# Altium PCB IT_FRONT_PANEL.PcbDoc (part 1 of 2)
Units mm, origin at the board's own origin, x right, y up, seen from the top; angles counter-clockwise.
Board outline 150 x 100 mm, 2 copper layers (Top Layer, Bottom Layer), stack 1.601 mm thick; 78 components, 80 nets, 343 pads, 132 vias.
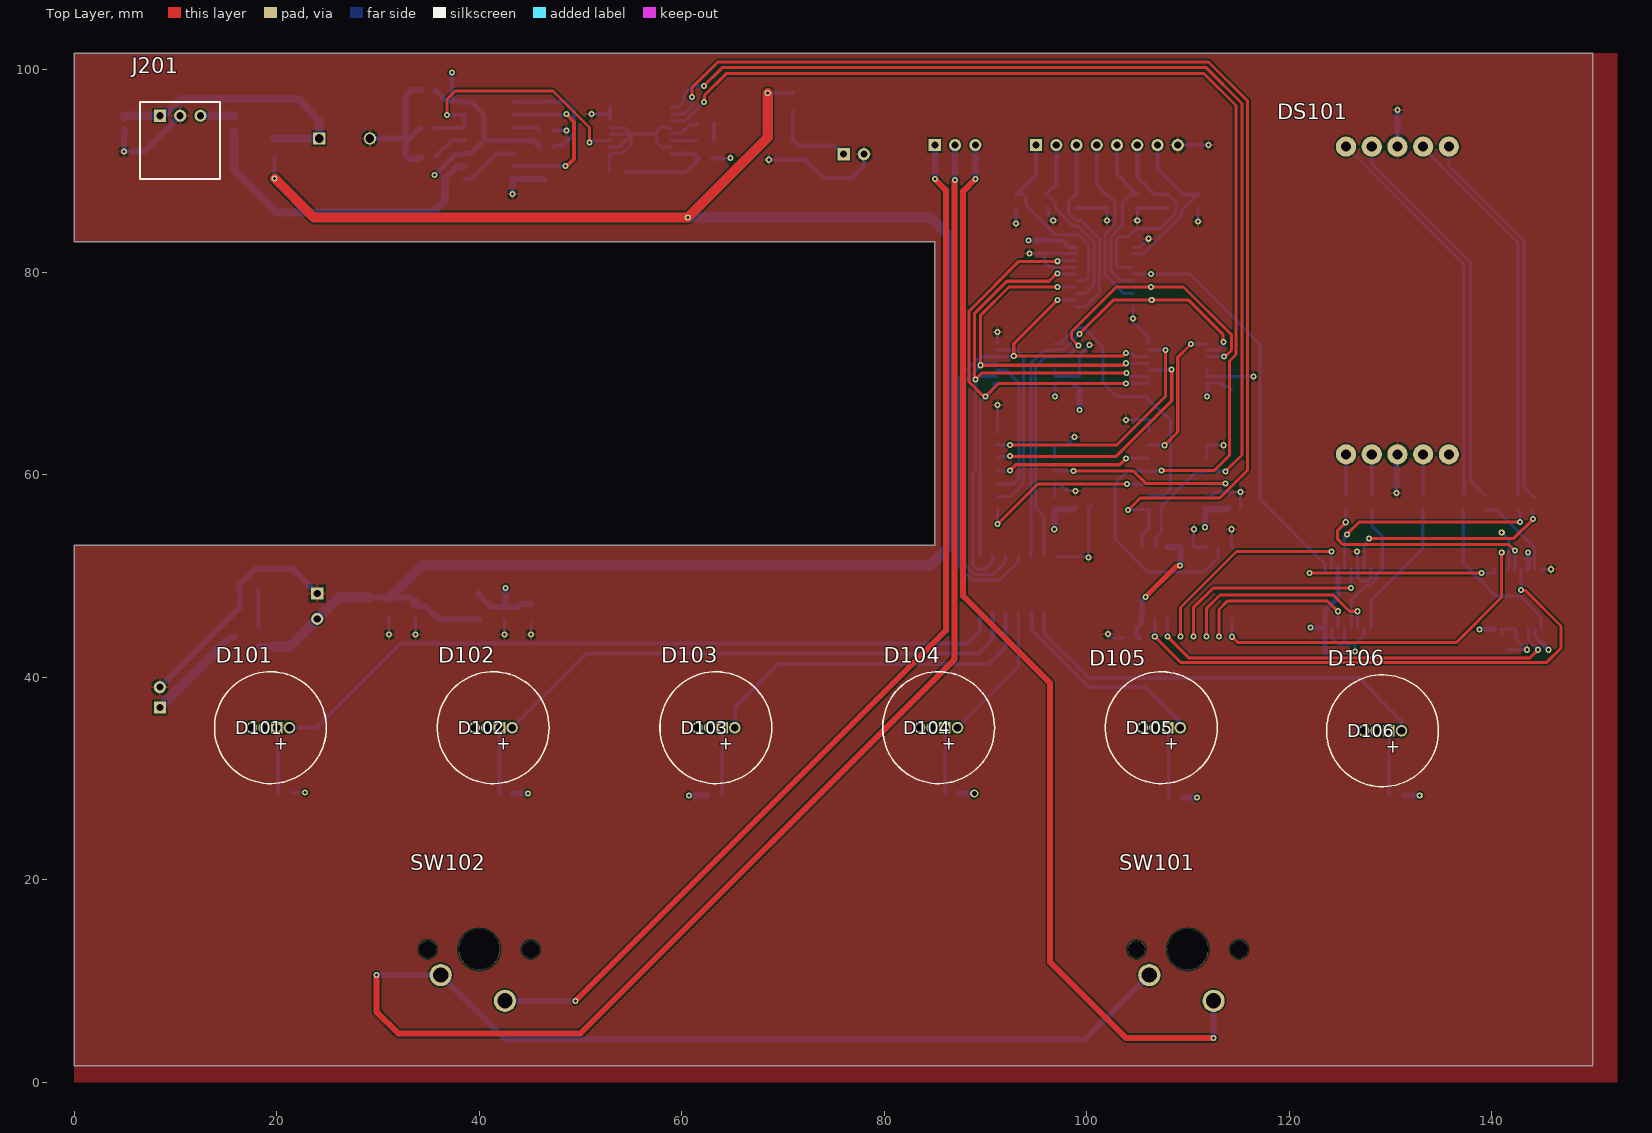
[diagram p0: Top Layer view]
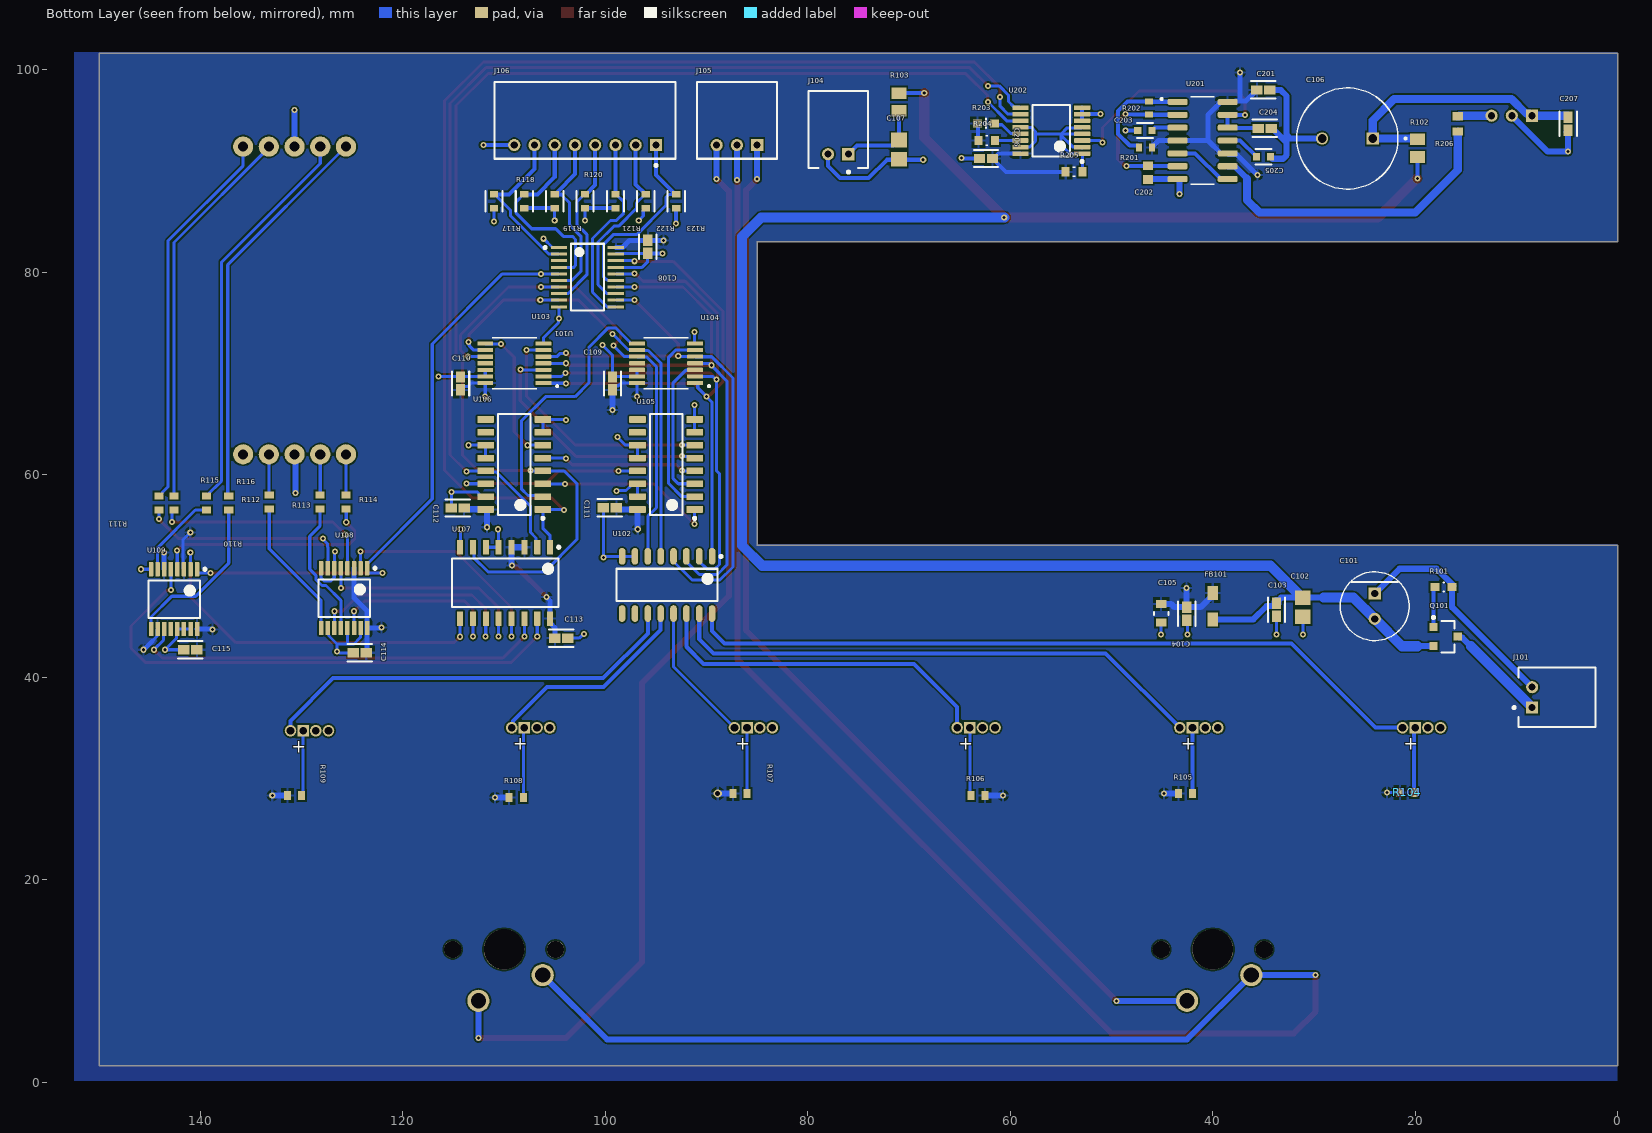
[diagram p1: Bottom Layer view, seen from below]
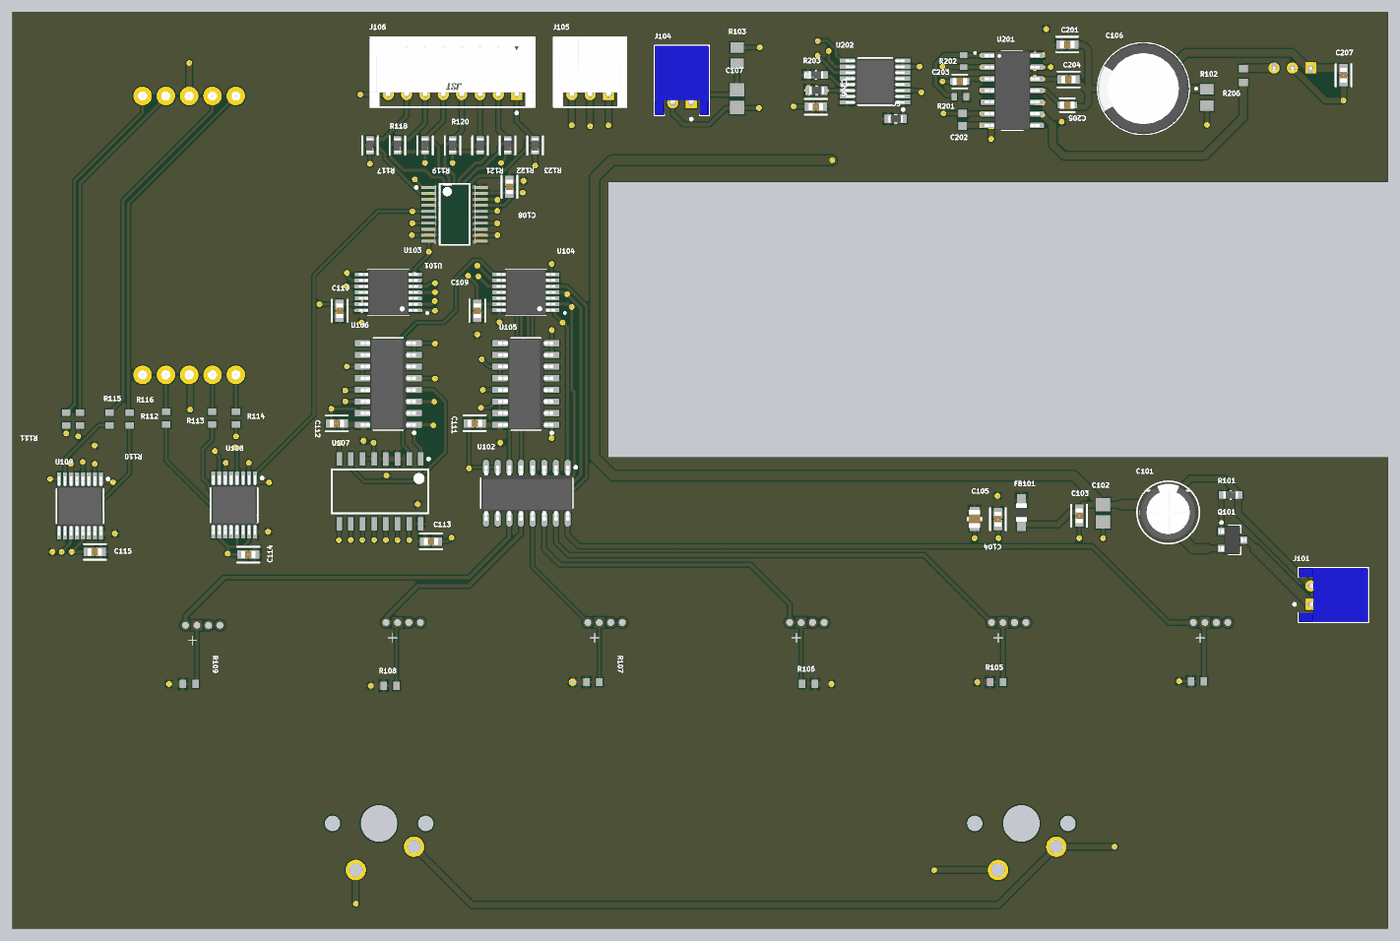
[diagram p2: 3D render of the assembled board from below, using the file's embedded part models]

## Layer stack, top to bottom
Top Solder: solder mask 0.0102, Solder Resist, Dk 3.5
Top Layer: signal copper 0.0356
Dielectric 1: dielectric 1.53, FR-4, Dk 4.8
Bottom Layer: signal copper 0.0356
Bottom Solder: solder mask 0.0102, Solder Resist, Dk 3.5

## Board outline
150,1.6 150,101.6 0,101.6 0,83 85,83 85,53 0,53 0,1.6

## Design rules (kind name [scope] priority, off if disabled: settings)
Clearance LED_Pad_Clearance [IsPad And InComponent('D101','D102','D103','D104','D105','D106') vs IsPad And InComponent('D101','D102','D103','D104','D105','D106')] p1: gap=0.1 ignorepadtopadclearanceinfootprint=FALSE
Clearance [All] p2: gap=0.15 ignorepadtopadclearanceinfootprint=TRUE
HoleSize HoleSize_SW [IsPad And (InComponent('SW101') Or InComponent('SW102'))] p1: absolutevalues=TRUE maxlimit=4 minlimit=0.025 maxpercent=80.000 minpercent=20.000
HoleSize [All] p2: absolutevalues=TRUE maxlimit=2.54 minlimit=0.025 maxpercent=80.000 minpercent=20.000
MinimumSolderMaskSliver [All] p1: minsoldermaskwidth=0.1
PolygonConnect [All] p1: connectstyle=Relief reliefconductorwidth=0.254 reliefentries=4 polygonreliefangle="90 Angle" airgapwidth=0.254
RoutingVias [All] p1: holewidth=0.3 width=0.6 viastyle="Through Hole" minholewidth=0.3 minwidth=0.6 maxholewidth=0.3 maxwidth=0.6
SilkToSilkClearance [All] p1: silktosilkclearance=0
SilkToSolderMaskClearance [IsPad] p1: minsilkscreentomaskgap=0 clearancetoexposedcopper=TRUE
SolderMaskExpansion [All] p1: expansion=0 istentingtop=FALSE
SupplyNets "Schematic Supply Nets" [InNet('GND')] p1: voltage=0.000
Width Width_SERVO [InNet('+5V_SERVO')] p1: maxlimit=2 minlimit=0.5 preferedwidth=1
Width [All] p2: maxlimit=2 minlimit=0.254 preferedwidth=0.254
26 further rules are at their usual default settings.

## Classes and differential pairs
component class 02_SERVO: C201 C202 C203 C204 C205 C206 C207 J201 R201 R202 R203 R204 R205 R206 U201 U202
component class 01_POWER_IO: C101 C102 C103 C104 C105 C106 C107 C108 C109 C110 C111 C112 C113 C114 C115 D101 D102 D103 D104 D105 D106 FB101 J101 J104 J105 J106 Q101 R101 R102 R103 R104 R105 R106 R107 R108 R109 R110 R111 R112 R113 R114 R115 R116 R117 R118 R119 R120 R121 R122 R123 SW101 SW102 U101 U102 U103 U104 U105 U106 U107 U108 U109

## Components (designator, comment, footprint, x,y, rotation, side; value= is the part's Value field where it differs from the comment)
C101 "100uF" FP-RAD-TH-D_6_3_0_5-L_11-MFG 24,47 r270 bottom
C102 "10uF" CAPC2013X140X45ML15T25 31.1,46.9 r90 bottom
C103 "100nF" FP-C1608-080-0_1-IPC_B 33.7,46.641 r270 bottom
C104 "10nF" FP-C2012-125-0_2-MFG 45.1,46.3 r270 bottom
C105 "100nF" FP-C1608-080-0_1-IPC_B 42.559,46.269 r90 bottom
C106 "470uF" CAPPRD500W60D1000H1250 26.7,93.2 r0 bottom (schematic designator 106)
C107 "10uF" CAPC2013X140X45ML15T25 71,92.1 r90 bottom
C108 "100nF" FP-C1608-080-0_1-IPC_B 95.8,82.5 r270 bottom
C109 "100nF" FP-C1608-080-0_1-IPC_B 99.3,69 r90 bottom
C110 "100nF" FP-C1608-080-0_1-IPC_B 114.3,69 r90 bottom
C111 "100nF" FP-C1608-080-0_1-IPC_B 99.559,56.719 r180 bottom
C112 "100nF" FP-C1608-080-0_1-IPC_B 114.6,56.7 r180 bottom
C113 "100nF" FP-C1608-080-0_1-IPC_B 104.343,43.84 r180 bottom
C114 "100nF" FP-C1608-080-0_1-IPC_B 124.259,42.4 r0 bottom
C115 "100nF" FP-C1608-080-0_1-IPC_B 140.984,42.7 r0 bottom
C201 "100nF" FP-C1608-080-0_1-IPC_B 35,98 r180 bottom
C202 "330nF" CAPC1608X90X35NL10T15 46.4,89.825 r90 bottom
C203 "10nF" FP-C1608-080-0_1-MFG 46.706,93.984 r0 bottom
C204 "100nF" FP-C1608-080-0_1-IPC_B 34.859,94.2 r0 bottom
C205 "10nF" FP-C1608-080-0_1-MFG 35,91.4 r180 bottom
C206 "100nF" FP-C1608-080-0_1-IPC_B 62.4,91.223 r180 bottom
C207 "100nF" FP-C1608-080-0_1-IPC_B 4.9,94.659 r270 bottom
D101 "DISP LEFT" 848_ADA 20,35 r0 top
D102 "DISP CENTER" 848_ADA 42,35 r0 top
D103 "DISP RIGHT" 848_ADA 64,35 r0 top
D104 "TILT LEFT" 848_ADA 86,35 r0 top
D105 "TILT RIGHT" 848_ADA 108,35 r0 top
D106 "VIBRATION" 848_ADA 129.85,34.7 r0 top
DS101 "SC10-21SURKWA" SC10-21SURKWA 130.7,77.2 r0 top
FB101 "120R@100MHz" WE-CBF_0805_L2W1.2H0.9_HC 40,47 r90 bottom
J101 "S2B-PH-K-S(LF)(SN)" JST-S2B-PH-K-S_V 6,38 r90 bottom
J104 "S2B-PH-K-S(LF)(SN)" JST-S2B-PH-K-S_V 77,94.1 r0 bottom
J105 "S3B-PH-K-S(LF)(SN)" FP-S3B-PH-K-S_LF_SN-MFG 87,95 r180 bottom
J106 "S8B-PH-K-S(LF)(SN)" FP-S8B-PH-K-S_LF_SN-MFG 102,95 r180 bottom
J201 "S3B-PH-K-S(LF)(SN)" FP-S3B-PH-K-S_LF_SN-MFG 10.46,93 r180 top
Q101 "AO3401A" AO-SOT-23-3L_V 17,44 r180 bottom
R101 "100k" FP-RC0603-0_55-MFG 17.2,48.9 r180 bottom
R102 "0R" RESC2013X70X40NL20T20 19.771,92.241 r90 bottom
R103 "0R" RESC2013X70X40NL20T20 71,96.8 r270 bottom
R104 "1K" RESC1608X55X25NL10T15 20.8,28.6 r180 bottom
R105 "1K" RESC1608X55X25NL10T15 42.7,28.5 r180 bottom
R106 "1K" RESC1608X55X25NL10T15 63.2,28.3 r0 bottom
R107 "1K" RESC1608X55X25NL10T15 86.7,28.5 r180 bottom
R108 "1K" RESC1608X55X25NL10T15 108.8,28.1 r180 bottom
R109 "1K" RESC1608X55X25NL10T15 130.7,28.3 r180 bottom
R110 "1K" RESC1608X55X25NL10T15 142.6,57.2 r270 bottom
R111 "1K" RESC1608X55X25NL10T15 144.1,57.2 r270 bottom
R112 "1K" RESC1608X55X25NL10T15 133.2,57.3 r270 bottom
R113 "1K" RESC1608X55X25NL10T15 128.2,57.3 r270 bottom
R114 "1K" RESC1608X55X25NL10T15 125.6,57.3 r270 bottom
R115 "1K" RESC1608X55X25NL10T15 139.4,57.2 r270 bottom
R116 "1K" RESC1608X55X25NL10T15 137.2,57.2 r270 bottom
R117 "10k" FP-RC0603-0_55-IPC_C 111,87 r270 bottom
R118 "10k" FP-RC0603-0_55-IPC_C 108,87 r270 bottom
R119 "10k" FP-RC0603-0_55-IPC_C 105,87 r270 bottom
R120 "10k" FP-RC0603-0_55-IPC_C 102,87 r270 bottom
R121 "10k" FP-RC0603-0_55-IPC_C 99,87 r270 bottom
R122 "10k" FP-RC0603-0_55-IPC_C 96,87 r270 bottom
R123 "10k" FP-RC0603-0_55-IPC_C 93,87 r270 bottom
R201 "82k" RESC1608X55X25LL10T15 46.65,92.3 r180 bottom
R202 "2.2k" RESC1608X55X25LL10T15 46.3,96.2 r90 bottom
R203 "8.2k" FP-RC0603-0_55-MFG 62.4,94.7 r0 bottom
R204 "13.7k" RESC1608X55N#1 62.32,93 r0 bottom
R205 "19.1k" RESC1608X55N#2 53.704,89.908 r0 bottom
R206 "220" RESC1608X55X25ML10T15 15.8,94.65 r90 bottom
SW101 "MX1A-E1NW" MX1A-E1NW 110,13.1 r0 top
SW102 "MX1A-E1NW" MX1A-E1NW 40,13.1 r0 top
U101 "SN74HC244PWR" FP-PW0020A-MFG 101.767,79.502 r180 bottom
U102 "ULN2003ADR" D0016A_M#1 93.9,49.1 r270 bottom
U103 "SN74HC86PWR" SOP65P640X120-14N#1 108.994,70.994 r0 bottom
U104 "SN74HC08PWR" SOP65P640X120-14N#2 94,71 r0 bottom
U105 "CD74HC283M96" D0016A_M#2 94,61 r0 bottom
U106 "CD74HC283M96" D0016A_M#2 109,61 r0 bottom
U107 "CD4511BNSR" NS0016A_L 109.9,49.3 r270 bottom
U108 "SN74HC157PWR" PW0016A_N 125.8,47.8 r270 bottom
U109 "SN74HC157PWR" PW0016A_N 142.6,47.7 r270 bottom
U201 "TLC556IDR" SOIC127P600X175-14N 41,93 r180 bottom
U202 "CD74HC4051PWR" PW0016A_M 55.95,93.975 r0 bottom

## Footprints (in the part's own frame and the unit in brackets; to place one, negate y for a bottom-side part, rotate by r counter-clockwise, add the part's x,y. Pads: shape width x height; smd on the part's side, far side on the other; paste and mask are expansions set on the pad)
848_ADA [mil]
  rect 45x45 hole 30 paste-99999 mask-22.5: 1(0,0)
  round 45 hole 30 paste-99999 mask-22.5: 2(49.21,0) 3(-49.21,0) 4(-98.43,0)
  silkscreen extent -242,-217 193,217
AO-SOT-23-3L_V [mm] "SOT23, 3-Leads, Body 3.1x1.8mm, Pitch 0.95mm"
  rect 0.8x0.8 smd: 1(-1.2,0.95) 2(-1.2,-0.95) 3(1.2,0)
  silkscreen extent -1.33,-1.55 0.9,2.02, body extent -1.5,-1.55 1.5,1.55, height 1.25
CAPC1608X90X35NL10T15 [mm] "Chip Capacitor, 2-Leads, Body 1.60x0.80mm, IPC Medium Density"
  rect 0.85x0.95 smd: 1(-0.675,0) 2(0.675,0)
  body extent -0.85,-0.45 0.85,0.45, height 0.9
CAPC2013X140X45ML15T25 [mm] "Chip Capacitor, 2-Leads, Body 2.00x1.25mm, IPC Low Density"
  rect 1.45x1.55 smd: 1(-0.95,0) 2(0.95,0)
  body extent -1.08,-0.7 1.07,0.7, height 1.4
CAPPRD500W60D1000H1250 [mm]
  round 1.2 hole 0.85: N(2.5,0)
  rect 1.2x1.2 hole 0.85: P(-2.5,0)
  silkscreen extent -5.85,-5 5,5, body extent -4.99,-5 5,5, height 12.5
D0016A_M#1 [mm] "SOIC, 16-Leads, Body 10x4mm, Pitch 1.27mm, IPC Low Density"
  oval 1.65x0.65 smd: 1(-2.825,4.445) 2(-2.825,3.175) 3(-2.825,1.905) 4(-2.825,0.635) 5(-2.825,-0.635) 6(-2.825,-1.905) 7(-2.825,-3.175) 8(-2.825,-4.445) 9(2.825,-4.445) 10(2.825,-3.175) 11(2.825,-1.905) 12(2.825,-0.635) 13(2.825,0.635) 14(2.825,1.905) 15(2.825,3.175) 16(2.825,4.445)
  silkscreen extent -2.95,-5 1.6,5.44, body extent -3,-4.95 3,4.95, height 1.59
D0016A_M#2 [mm] "SOIC, 16-Leads, Body 10x4mm, Pitch 1.27mm, IPC Low Density"
  rrect15% 1.65x0.65 smd: 1(-2.825,4.445) 2(-2.825,3.175) 3(-2.825,1.905) 4(-2.825,0.635) 5(-2.825,-0.635) 6(-2.825,-1.905) 7(-2.825,-3.175) 8(-2.825,-4.445) 9(2.825,-4.445) 10(2.825,-3.175) 11(2.825,-1.905) 12(2.825,-0.635) 13(2.825,0.635) 14(2.825,1.905) 15(2.825,3.175) 16(2.825,4.445)
  silkscreen extent -2.95,-5 1.6,5.44, body extent -3,-4.95 3,4.95, height 1.59
FP-C1608-080-0_1-IPC_B [mm]
  rect 1.131x0.912 smd paste+0 mask+0: 1(-0.641,0) 2(0.641,0)
  silkscreen extent -1.21,-0.86 1.21,0.86, body extent -0.8,-0.4 0.8,0.4, height 0.9
FP-C1608-080-0_1-MFG [mm]
  rect 0.7x0.7 smd paste+0 mask+0: 1(-0.7,0) 2(0.7,0)
  silkscreen extent -0.8,-0.75 0.8,0.75, body extent -0.8,-0.4 0.8,0.4, height 0.9
FP-C2012-125-0_2-MFG [mm]
  rect 0.8x1.05 smd paste+0 mask+0: 1(-0.925,0) 2(0.925,0)
  silkscreen extent -0.15,-0.72 0.15,0.72, body extent -1,-0.63 1,0.63, height 1.45
FP-PW0020A-MFG [mm]
  rect 1.6x0.3 smd paste-1000 mask+0: 1(-2.8,2.925) 2(-2.8,2.275) 3(-2.8,1.625) 4(-2.8,0.975) 5(-2.8,0.325) 6(-2.8,-0.325) 7(-2.8,-0.975) 8(-2.8,-1.625) 9(-2.8,-2.275) 10(-2.8,-2.925) 11(2.8,-2.925) 12(2.8,-2.275) 13(2.8,-1.625) 14(2.8,-0.975) 15(2.8,-0.325) 16(2.8,0.325) 17(2.8,0.975) 18(2.8,1.625) 19(2.8,2.275) 20(2.8,2.925)
  silkscreen extent -4.3,-3.3 1.63,3.3, body extent -3.2,-3.25 3.2,3.25, height 1.2
FP-RAD-TH-D_6_3_0_5-L_11-MFG [mm]
  rect 1.2x1.2 hole 0.7 paste-2539.97 mask+0: 1(-1.25,0)
  round 1.2 hole 0.7 paste-2539.97 mask+0: 2(1.25,0)
  silkscreen extent -3.4,-3.4 3.4,3.4, body extent -3.15,-3.16 3.14,3.14, height 12.2
FP-RC0603-0_55-IPC_C [mm]
  rect 0.659x0.812 smd paste+0 mask+0: 1(-0.677,0) 2(0.677,0)
  silkscreen extent -1.01,-0.85 1.01,0.85, body extent -0.8,-0.4 0.8,0.4, height 0.55
FP-RC0603-0_55-MFG [mm]
  rect 0.9x0.8 smd paste+0 mask+0: 1(-0.85,0) 2(0.85,0)
  silkscreen extent -0.03,-0.45 0.03,0.45, body extent -0.8,-0.4 0.8,0.4, height 0.55
FP-S3B-PH-K-S_LF_SN-MFG [mm]
  rect 1.2x1.2 hole 0.7 paste-2539.97 mask+0: 1(2,-2.45)
  round 1.2 hole 0.7 paste-2539.97 mask+0: 2(0,-2.45) 3(-2,-2.45)
  silkscreen extent -3.95,-3.8 3.95,3.8, body extent -3.95,-3.8 3.95,3.8, height 4.8
FP-S8B-PH-K-S_LF_SN-MFG [mm]
  rect 1.2x1.2 hole 0.7 paste-2539.97 mask+0: 1(7,-2.45)
  round 1.2 hole 0.7 paste-2539.97 mask+0: 2(5,-2.45) 3(3,-2.45) 4(1,-2.45) 5(-1,-2.45) 6(-3,-2.45) 7(-5,-2.45) 8(-7,-2.45)
  silkscreen extent -8.95,-4.57 8.95,3.8, body extent -8.95,-3.8 8.95,3.8, height 4.8
JST-S2B-PH-K-S_V [mm] "THD, 2-Leads, Body 7.6x5.9mm, Pitch 2mm"
  rect 1.2x1.2 hole 0.7: 1(-1,2.45)
  round 1.2 hole 0.7: 2(1,2.45)
  silkscreen extent -2.95,-3.8 2.95,4.35, body extent -2.95,-3.8 2.95,3.8, height 4.8
MX1A-E1NW [mm]
  round 2.2 hole 1.5: 1(2.54,-5.08) 2(-3.81,-2.54)
  round 1.7 hole 1.7 unplated: ""(-5.08,0) ""(5.08,0)
  round 4 hole 4 unplated: ""(0,0)
NS0016A_L [mm] "SOIC,16-Leads,Body 10.5x5.6mm,Pitch 1.27mm,IPC High Density"
  rrect17% 1.45x0.6 smd: 1(-3.525,4.445) 2(-3.525,3.175) 3(-3.525,1.905) 4(-3.525,0.635) 5(-3.525,-0.635) 6(-3.525,-1.905) 7(-3.525,-3.175) 8(-3.525,-4.445) 9(3.525,-4.445) 10(3.525,-3.175) 11(3.525,-1.905) 12(3.525,-0.635) 13(3.525,0.635) 14(3.525,1.905) 15(3.525,3.175) 16(3.525,4.445)
  silkscreen extent -3.65,-5.25 2.4,5.42, body extent -2.8,-5.25 2.8,5.25, height 2
PW0016A_M [mm] "SOP, 16-Leads, Body 5.1x4.5mm, Pitch 0.65mm, IPC Low Density"
  rrect22% 1.6x0.45 smd: 1(-3.05,2.275) 2(-3.05,1.625) 3(-3.05,0.975) 4(-3.05,0.325) 5(-3.05,-0.325) 6(-3.05,-0.975) 7(-3.05,-1.625) 8(-3.05,-2.275) 9(3.05,-2.275) 10(3.05,-1.625) 11(3.05,-0.975) 12(3.05,-0.325) 13(3.05,0.325) 14(3.05,0.975) 15(3.05,1.625) 16(3.05,2.275)
  silkscreen extent -3.17,-2.55 1.85,3.17, body extent -3.21,-2.5 3.21,2.5, height 1
PW0016A_N [mm] "SOP, 16-Leads, Body 5.1x4.5mm, Pitch 0.65mm, IPC Medium Density"
  rrect22% 1.4x0.45 smd: 1(-2.95,2.275) 2(-2.95,1.625) 3(-2.95,0.975) 4(-2.95,0.325) 5(-2.95,-0.325) 6(-2.95,-0.975) 7(-2.95,-1.625) 8(-2.95,-2.275) 9(2.95,-2.275) 10(2.95,-1.625) 11(2.95,-0.975) 12(2.95,-0.325) 13(2.95,0.325) 14(2.95,0.975) 15(2.95,1.625) 16(2.95,2.275)
  silkscreen extent -3.07,-2.55 1.85,3.17, body extent -3.21,-2.5 3.21,2.5, height 1
RESC1608X55N#1 [mm]
  rect 0.79x0.93 smd paste+0 mask+0.102: 1(-0.82,0) 2(0.82,0)
  silkscreen extent -0.11,-0.45 0.11,0.45, body extent -0.8,-0.4 0.8,0.4, height 0.55
RESC1608X55N#2 [mm]
  rect 0.79x0.93 smd: 1(-0.82,0) 2(0.82,0)
  silkscreen extent -0.11,-0.45 0.11,0.45, body extent -0.8,-0.4 0.8,0.4, height 0.55
RESC1608X55X25LL10T15 [mm] "Chip Resistor, 2-Leads, Body 1.60x0.80mm, IPC High Density"
  rect 0.6x0.8 smd: 1(-0.65,0) 2(0.65,0)
  body extent -0.85,-0.45 0.85,0.45, height 0.55
RESC1608X55X25ML10T15 [mm] "Chip Resistor, 2-Leads, Body 1.70x0.90mm, IPC Low Density"
  rect 0.8x1 smd: 1(-0.75,0) 2(0.75,0)
  body extent -0.85,-0.45 0.85,0.45, height 0.55
RESC1608X55X25NL10T15 [mm] "Chip Resistor, 2-Leads, Body 1.60x0.80mm, IPC Medium Density"
  rect 0.7x0.9 smd: 1(-0.7,0) 2(0.7,0)
  body extent -0.85,-0.45 0.85,0.45, height 0.55
RESC2013X70X40NL20T20 [mm] "Chip Resistor, 2-Leads, Body 2.00x1.25mm, IPC Medium Density"
  rect 1.15x1.45 smd: 1(-0.875,0) 2(0.875,0)
  body extent -1.1,-0.72 1.1,0.72, height 0.7
SC10-21SURKWA [mm]
  round 2 hole 1: 1(-5.08,-15.2) 2(-2.54,-15.2) 3(0,-15.2) 4(2.54,-15.2) 5(5.08,-15.2) 6(5.08,15.2) 7(2.54,15.2) 8(0,15.2) 9(-2.54,15.2) 10(-5.08,15.2)
  body extent -12,-17 12,17, height 10.5
SOIC127P600X175-14N [mm]
  rrect50% 1.97x0.6 smd paste+0 mask+0.102: 1(-2.475,3.81) 2(-2.475,2.54) 3(-2.475,1.27) 4(-2.475,0) 5(-2.475,-1.27) 6(-2.475,-2.54) 7(-2.475,-3.81) 8(2.475,-3.81) 9(2.475,-2.54) 10(2.475,-1.27) 11(2.475,0) 12(2.475,1.27) 13(2.475,2.54) 14(2.475,3.81)
  silkscreen extent -4.15,-4.33 1.17,4.33, body extent -3,-4.33 3,4.33, height 1.75
SOP65P640X120-14N#1 [mm]
  rrect25% 1.57x0.41 smd paste+0 mask+0.05: 1(-2.87,1.95) 2(-2.87,1.3) 3(-2.87,0.65) 4(-2.87,0) 5(-2.87,-0.65) 6(-2.87,-1.3) 7(-2.87,-1.95) 8(2.87,-1.95) 9(2.87,-1.3) 10(2.87,-0.65) 11(2.87,0) 12(2.87,0.65) 13(2.87,1.3) 14(2.87,1.95)
  silkscreen extent -4.34,-2.5 2.2,2.5, body extent -3.2,-2.5 3.2,2.5, height 1.2
SOP65P640X120-14N#2 [mm]
  rrect25% 1.57x0.41 smd: 1(-2.87,1.95) 2(-2.87,1.3) 3(-2.87,0.65) 4(-2.87,0) 5(-2.87,-0.65) 6(-2.87,-1.3) 7(-2.87,-1.95) 8(2.87,-1.95) 9(2.87,-1.3) 10(2.87,-0.65) 11(2.87,0) 12(2.87,0.65) 13(2.87,1.3) 14(2.87,1.95)
  silkscreen extent -4.34,-2.5 2.2,2.5, body extent -3.2,-2.5 3.2,2.5, height 1.2
WE-CBF_0805_L2W1.2H0.9_HC [mm] "SMD EMI Suppression Ferrite  Bead, body 2.00x1.20mm"
  rect 1.4x1 smd: 1(-1.3,0) 2(1.3,0)
  body extent -1,-0.6 1,0.6, height 0.9

## Part data
C101: library part CMP-05427-000141-1, "Aluminum Electrolytic Capacitors (Radial Lead Type) AEC-Q200 Qualified 100uF ±20% 25V", Case/Package=Radial, Max Operating Temperature=105°C, Min Operating Temperature=-55°C, Package Quantity=2000, Ripple Current=130mA, Tolerance=20%, Voltage Rating=25V, Capacitance=100uF, Construction=RADIAL, Contact Plating=Tin, Diameter=6.3mm, Height=11.2mm, Height - Seated (Max)=0.48inch, Lead Diameter=0.5mm, Lead Pitch=2.5mm, Lead/Base Style=Straight, Length=11.2mm, Life (Hours)=1000Hour, Mount="Through Hole", Packaging="Ammo Pack", Radiation Hardening=No, RoHS Compliant=Yes, Series=NHG, Termination=Radial, Voltage Rating (DC)=25V, Width=6.3mm
C102 C107: library part CMP-2007-03370-1, Manufacturer=Murata, Part Number=GRM21BR71A106KE51K
C103 C105 C108 C109 C110 C111 C112 C113 C114 C115 C201 C204 C206 C207: library part CMP-2000-04982-2, "Multilayer Ceramic Capacitors 100nF ±10% 50V X7R SMD 0603", Case Code (Imperial)=0603, Case Code (Metric)=1608, Dielectric=X7R, Dielectric Material=Ceramic, Max Operating Temperature=125°C, Min Operating Temperature=-55°C, Package Quantity=1, Tolerance=10%, Voltage=50V, Capacitance=100nF, Case/Package=0603, Construction=Flat, Depth=0.8mm, Height=0.8mm, Lead Free="Lead Free", Length=1.6mm, Mount="Surface Mount", Number of Pins=2, Packaging="Tape and Reel", Radiation Hardening=No, REACH SVHC="No SVHC", Resistor Type=Ceramic, RoHS Compliant=Yes, Series=C, Termination=SMD/SMT, Thickness=0.037inch, Voltage Rating=50V, Voltage Rating (DC)=50V, Weight=7.1E-05oz, Width=0.031inch
C104: library part CMP-2000-05452-2, "Multilayer Ceramic Capacitors 10μF ±10% 10V X7R SMD 0805", Capacitance=10uF, Case Code (Imperial)=0805, Case Code (Metric)=2012, Dielectric=X7R, Dielectric Material=Ceramic, Max Operating Temperature=125°C, Min Operating Temperature=-55°C, Package Quantity=1, Tolerance=10%, Voltage=10V, Case/Package=0805, Construction=Flat, Contact Plating=Tin, Depth=1.25mm, Height=1.25mm, Lead Free="Lead Free", Length=2mm, Mount="Surface Mount", Number of Pins=2, Packaging="Tape and Reel", Radiation Hardening=No, REACH SVHC="No SVHC", Resistor Type=Ceramic, RoHS Compliant=Yes, Series=C, Termination=SMD/SMT, Thickness=0.057inch, Voltage Rating=10V, Voltage Rating (DC)=10V, Weight=0.000194oz, Width=0.049inch
C106: library part ECA1EHG471, "Cap Aluminum 470uF 25V 20% (10 X 12.5mm) Radial Aluminum Cylindrical Can 5mm 380mA 2000 hr 105C Bulk", Package="RADIAL-2 Panasonic", Availability="In Stock", Check_prices=https://www.snapeda.com/parts/ECA1EHG471/Panasonic/view-part/5793074/?ref=eda, MF=Panasonic, MP=ECA1EHG471, Price=None, Purchase-URL=https://pricing.snapeda.com/search/part/ECA1EHG471/?ref=eda, SnapEDA_Link=https://www.snapeda.com/parts/ECA1EHG471/Panasonic/view-part/5793074/?ref=snap
C202: library part CMP-2006-02854-1, Manufacturer=Murata, Part Number=GRM188R71C334KA01D
C203 C205: library part CMP-2000-06026-2, "Multilayer Ceramic Capacitors 10nF ±10% 50V X7R SMD 0603", Case Code (Imperial)=0603, Case Code (Metric)=1608, Dielectric=X7R, Dielectric Material=Ceramic, Max Operating Temperature=125°C, Min Operating Temperature=-55°C, Package Quantity=1, Tolerance=10%, Voltage=50V, Capacitance=10nF, Case/Package=0603, Construction=Flat, Depth=0.8mm, Height=0.8mm, Lead Free="Lead Free", Length=1.6mm, Mount="Surface Mount", Packaging="Tape and Reel", Radiation Hardening=No, REACH SVHC="No SVHC", Resistor Type=Ceramic, RoHS Compliant=Yes, Series=C, Termination=SMD/SMT, Thickness=0.037inch, Voltage Rating=50V, Voltage Rating (DC)=50V, Weight=7.1E-05oz, Width=0.031inch
D101 D102 D103 D104 D105 D106: library part 848, "Description", Manufacturer_Name="Adafruit Industries", Copyright="Copyright (C) 2026 Ultra Librarian. All rights reserved.", Manufacturer_Part_Number=848, RefDes=RefDes, Type=Type
DS101: library part SC56-11EWA, "Description", Manufacturer_Name=Kingbright, Copyright="Copyright (C) 2026 Ultra Librarian. All rights reserved.", Manufacturer_Part_Number=SC56-11EWA, RefDes=RefDes, Type=Type
FB101: library part CMP-03913-130924299-1, "742792025 Ferrite Bead, Suppression, 120 Ohm, 5A Rohs Compliant: Yes", Current Rating=3A, Max Operating Temperature=125°C, Min Operating Temperature=-55°C, Height=900µm, Length=2mm, NexarPartId=130924299, RoHS=Compliant, Width=1.2mm
J101 J104: library part CMP-1755-00004-1, "Male Header, Pitch 2 mm, 1 x 2 Position, Height 4.8 mm, Tail Length 3.4 mm, -25 to 85 degC, RoHS, Bulk", Capacitance="10 uF", Case\Package=Radial, Max Operating Temperature="85 degC", Min Operating Temperature="-40 degC", Package Quantity=200, Tolerance=20%, Voltage Rating="50 V", ComponentLink1Description=Datasheet, ComponentLink1URL=http://www.jst-mfg.com/product/pdf/eng/ePH.pdf, DatasheetVersion=Dec-12, Diameter="5 mm", Height="11 mm", Lead Pitch="2 mm", Length="11 mm", Mount="Through Hole", PackageDescription="Male Header, Pitch 2 mm, 1 x 2 Position, Height 4.8 mm, Tail Length 3.4 mm", PackageReference=S2B-PH-K-S, Packaging=Bulk, Pins=2, Radiation Hardening=No, REACH SVHC="No SVHC", RoHSCompliant=true, Voltage Rating (DC)="50 V"
J105 J201: library part CMP-17439-000039-1, "CONN HEADER R/A 3POS 2MM", Height=0.31inch, Length=0.31inch, Weight=0.0625lb, Width=0.31inch
J106: library part CMP-17439-000161-1, "CONN HEADER R/A 8POS 2MM", Color=White, Contact Resistance=20mR, Current Rating=2A, Flammability Rating="UL94 V-0", Insulation Color=Natural, Insulation Resistance=1GR, Max Operating Temperature=85°C, Max Voltage Rating (AC)=100V, Min Operating Temperature=-25°C, Connector Type=Header, Contact Finish - Mating=TIN, Contact Material=Brass, Contact Mating Length=0.13inch, Contact Plating=Tin, Contact Shape=Square, Contact Type="Male Pin", Depth=7.6mm, Fastening Type=Detent, Gender=Male, Height=9.4mm, Housing Color=White, Housing Material=Polyamide, Insulation Material=Nylon, Lead Free="Lead Free", Lead Pitch=2mm, Length=17.9mm, Max Current Rating=2A, Mount="Through Hole", Number of Contacts=8, Number of Pins=8, Number of Poles=8, Number of Positions=8, Number of Rows=1, Orientation="Right Angle", Packaging=Bulk, Pitch=2mm, REACH SVHC="No SVHC", Series=PH, Termination=Solder, Voltage Rating=100V, Voltage Rating (AC)=100V, Width=4.5mm, Working Voltage=100V
Q101: library part CMP-2000-05778-1, "P-Channel MOSFET, 30 V, 4 A, -55 to 150 degC, 3-Pin SOT-23-3L, RoHS, Tape and Reel", Continuous Drain Current=4A, Drain-Source On-Volt=30V, Frequency (Max)=NotRequiredMHz, Gate-Source Voltage (Max)=?12V, Manufacturer="Alpha and Omega", Operating Temp Range=-55Cto150C, Operating Temperature Classification=Military, Output Power (Max)=NotRequiredW, Package Description="3-Pin Small Outline Transistor, Body 2.95 x 1.6 mm, Pitch 0.95 mm", Package Reference=SOT-23-3L, Package Type=SOT-23, Power Dissipation=1.4W, Power Gain=NotRequireddB, Channel Mode=Enhancement, Datasheet URL=http://www.aosmd.com/res/data_sheets/AO3401A.pdf, Datasheet Version="Rev. 3, 03/2011", Drain Current (Max)=4A, Drain Efficiency=NotRequired%, Drain-Source On-Res=0.044ohm, Manufacturer URL=http://www.aosmd.com/, Mounting=SurfaceMount, Mounting Technology=SurfaceMount, Noise Figure=NotRequireddB, Number of  Elements=1, Package URL=http://www.aosmd.com/res/packaging_information/SOT-23-3L.pdf, Pin Count=3, Polarity=P, Rad Hardened=No, Type=PowerMOSFET
R101: library part CMP-2100-03662-2, "RES SMD 100K OHM 1% 1/10W 0603", Case Code (Imperial)=0603, Case Code (Metric)=1608, Max Operating Temperature=155°C, Max Power Dissipation=100mW, Min Operating Temperature=-55°C, Resistance=100kR, Resistance Tolerance=1%, Resistor Type="Thick Film", Temperature Coefficient=100ppm/°C, Voltage Rating=50V, Working Voltage=75V, Case/Package=0603, Construction=Rectangular, Depth=0.8mm, Features="Moisture Resistant", Height=0.45mm, Lead Free="Lead Free", Length=1.6mm, Military Standard=Not, Number of Pins=2, Number of Terminations=2, Packaging="Tape and Reel", Power Rating=100mW, REACH SVHC="No SVHC", RoHS Compliant=Yes, Series=RC, Technology="THICK FILM", Termination=SMD/SMT, Tolerance=1%, Voltage Rating (DC)=50V, Width=0.8mm
R102 R103: library part CMP-1665-00002-5, "Chip Resistor, 0 Ohm, +/- 1%, 0.125 W, -55 to 155 degC, 0805 (2012 Metric), RoHS, Tape and Reel", Case Code (Imperial)=0805, Case Code (Metric)=2012, Max Operating Temperature="155 degC", Min Operating Temperature="-55 degC", Package Quantity=5000, PartNumber=ERJ-6GEY0R00V, Resistance="0 Ohm", Tolerance=5%, Case/Package=0805, ComponentLink1Description="Manufacturer URL", ComponentLink1URL=http://www.panasonic.com/, ComponentLink2Description=Datasheet, ComponentLink2URL=http://industrial.panasonic.com/cdbs/www-data/pdf/RDA0000/AOA0000C84.pdf, DatasheetVersion=03/2015, Height="0.6 mm", Length="2 mm", Mounting Technology="Surface Mount", PackageDescription="2-Pin Surface Mount Device, Body 2 x 1.25 mm", Packaging="Tape and Reel", Radiation Hardening=No, REACH SVHC="No SVHC", RoHSCompliant=True, Width="1.25 mm"
R104 R105 R106 R107 R108 R109 R110 R111 R112 R113 R114 R115 R116: library part CMP-2000-04205-1, Manufacturer=Yageo, Part Number=RC0603FR-131KL
R117 R118 R119 R120 R121 R122 R123: library part CMP-2100-03664-2, "RES 10K OHM 1% 1/10W 0603", Case Code (Imperial)=0603, Case Code (Metric)=1608, Max Operating Temperature=155°C, Max Power Dissipation=100mW, Min Operating Temperature=-55°C, Resistance=10kR, Resistance Tolerance=1%, Resistor Type="Thick Film", Temperature Coefficient=100ppm/°C, Voltage Rating=75V, Voltage Rating (DC)=50V, Case/Package=0603, Construction=Rectangular, Depth=0.8mm, Features="Moisture Resistant", Height=0.45mm, Lead Free="Lead Free", Lead Pitch=0.3mm, Length=1.6mm, Military Standard=Not, Number of Pins=2, Number of Terminations=2, Packaging="Tape and Reel", Power Rating=100mW, RoHS Compliant=Yes, Series=RC, Size Code=0603, Termination=SMD/SMT, Tolerance=1%, Weight=7.1E-05oz, Width=0.8mm
R201: library part CMP-2000-06947-1, "Chip Resistor, 82 KOhm, +/- 1%, 0.1 W, -55 to 155 degC, 0603 (1608 Metric), RoHS, Tape and Reel", Case Code - in=0603, Case Code - mm=1608, Manufacturer=Yageo, Operating Temperature Range=-55Cto+155C, Package / Case=0603(1608metric), Package Description="2-Pin Surface Mount Device, Body 1.6 x 0.8 mm", Power Rating=100mW, Resistance=82kOhms, Temperature Coefficient=100PPM/C, Tolerance=1%, Voltage Rating=75V, Brand=Yageo, Datasheet URL=http://www.yageo.com/documents/recent/PYu-RC_Group_51_RoHS_L_7.pdf, Datasheet Version="Rev. 7, 05/2017", Height=0.45mm, Length=1.6mm, Manufacturer URL=http://www.yageo.com/, Mounting Technology=SurfaceMount, Package Reference=0603, Packaging=Reel, Product=ThickFilmResistorsGeneralPurpose, Product Category=ThickFilmResistors, RoHS=True, Series=RC, Termination Style=SMD/SMT, Type=GeneralPurposeChipResistorSurfaceMount, Unit Weight=0.000071oz, Width=0.8mm
R202: library part CMP-2000-06934-1, "Thick Film Resistor, 2.2 KOhm, 100 mW, 50 V, +/- 1%, -55 to 155 degC, 2-Pin SMD (0603), RoHS, Tape and Reel", Case Code - in=0603, Case Code - mm=1608, Manufacturer=Yageo, Operating Temperature Range=-55Cto+155C, Package Description="2-Pin Surface Mount Device, Body 1.6 x 0.8 mm", Power Rating=100mW, Resistance=2.2kOhms, Temperature Coefficient=100PPM/C, Tolerance=1%, Voltage Rating=50V, Datasheet URL=http://www.yageo.com/documents/recent/PYu-RC_Group_51_RoHS_L_7.pdf, Datasheet Version="Rev. 7, 05/2017", Manufacturer URL=http://www.yageo.com/, Mounting Technology=SurfaceMount, Package Reference=0603, Packaging=Reel, Product=ThickFilmResistorsGeneralPurpose, Series=RC, Termination Style=SMD/SMT
R203: library part CMP-1659-00040-2, Case Code (Imperial)=0603, Case Code (Metric)=1608, Max Operating Temperature=155°C, Max Power Dissipation=100mW, Min Operating Temperature=-55°C, Resistance=8.2kΩ, Temperature Coefficient=100ppm/°C, Tolerance=1%, Voltage Rating=50V, Case/Package=0603, Composition="Thick Film", Depth=800µm, Features="Moisture Resistant", Height=450µm, Lead Free="Lead Free", Lead Pitch=300µm, Length=1.6mm, Military Standard=Not, NexarPartId=40301092, Number of Pins=2, Number of Terminations=2, Packaging="Tape & Reel", Power Rating=100mW, REACH SVHC="No SVHC", RoHS=Compliant, Schedule B="8533210045, 8533210045", Termination=SMD/SMT, Voltage Rating (AC)=50V, Voltage Rating (DC)=50V, Width=800µm
R204: library part RC0603FR-0713K7L, "13.7 kOhms Â±1% 0.1W, 1/10W Chip Resistor 0603 (1608 Metric) Moisture Resistant Thick Film", Package="1608 Yageo", Check_prices=https://www.snapeda.com/parts/RC0603FR-0713K7L/Yageo/view-part/?ref=eda, MF=Yageo, MP=RC0603FR-0713K7L, SnapEDA_Link=https://www.snapeda.com/parts/RC0603FR-0713K7L/Yageo/view-part/?ref=snap
R205: library part RC0603FR-0719K1L, "19.1 kOhms Â±1% 0.1W, 1/10W Chip Resistor 0603 (1608 Metric) Moisture Resistant Thick Film", Package="1608 Yageo", Check_prices=https://www.snapeda.com/parts/RC0603FR-0719K1L/Yageo/view-part/?ref=eda, MF=Yageo, MP=RC0603FR-0719K1L, SnapEDA_Link=https://www.snapeda.com/parts/RC0603FR-0719K1L/Yageo/view-part/?ref=snap
R206: library part CMP-1659-00018-2, "General Purpose Chip Resistors, 220 Ohm, +/- 1%, -55 to 155 degC, 0603 (1608 Metric), RoHS, Tape and Reel", ComponentLink1Description="Manufacturer URL", ComponentLink1URL=http://www.yageo.com/, ComponentLink2Description=Datasheet, ComponentLink2URL=https://datasheet.ciiva.com/11808/0900766b80f96399-11808136.pdf, DatasheetVersion="Rev. 4, 04/2009", PackageDescription="2-Pin Surface Mount Device, Body 1.6 x 0.8 mm", PackageReference=0603, RoHSCompliant=false
SW101 SW102: "SPST-NO Mechanical Key Switch, 2-Pin", Case/Package=B3U-1000, Contact Current Rating=50mA, IP Rating=IP40, Manufacturer="Omron Electronic Components", Manufacturer Part Number=B3U-1000P, Max Contact Resistance=100mohm, Max Operating Temperature=70°C, Max Voltage Rating (DC)=12V, Min Operating Temperature=-25°C, Operating Force=153gf, Package Description="2-Pin Surface Mount Device, Body 3 x 2.5 mm", Package Quantity=3500, Resistance=0.1Ohm, Component Type=Switches, Contact Material=Silver, Current Rating=50mA, Datasheet URL=http://www.omron.com/ecb/products/pdf/en-b3u.pdf, Datasheet Version=Jan-15, Manufacturer URL=http://www.omron.com/, Max Current Rating=50mA, Mounting Technology=SM, Package Reference=B3U-1000, Packaging=TapeandReel, RoHS Compliant=True, Throw Configuration=SPST, Voltage Rating=12V, Voltage Rating (DC)=12V
U101: library part CMP-0440-01258-4, "IC BUFFER NON-INVERT 6V 20TSSOP", Case/Package=TSSOP, High Level Output Current=-7.8mA, Low Level Output Current=7.8mA, Max Operating Temperature=85°C, Max Supply Voltage=6V, Min Operating Temperature=-40°C, Min Supply Voltage=2V, Operating Supply Voltage=5V, Package Quantity=2000, Quiescent Current=8uA, Contact Plating=Gold, Height=1.15mm, Lead Free="Lead Free", Length=6.5mm, Logic Function=Buffer, Mount="Surface Mount", Number of Bits=8, Number of Bits per Element=4, Number of Channels=8, Number of Circuits=8, Number of Elements=2, Number of Input Lines=8, Number of Inputs=8, Number of Output Lines=8, Number of Outputs=8, Number of Pins=20, Packaging="Tape and Reel", Polarity=Non-Inverting, Propagation Delay=250ns, Radiation Hardening=No, REACH SVHC="No SVHC", Turn-On Delay Time=250ns, Width=4.4mm
U102: library part CMP-2000-04953-1, "High-Voltage, High-Current Darlington Transistor Array, 0.5 A, 50 V, -20 to 70 degC, 16-Pin SOIC (D), Green (RoHS & no Sb/Br), Tape and Reel", Manufacturer=TexasInstruments, Maximum Collector Emitter Saturation Voltage=1.1@100mA, Maximum Collector Emitter Voltage=50V, Package=16SOIC, Package Description="16-Pin Plastic Small Outline, Body 9.9 x 3.9 mm, Pitch 1.27 mm", Package Reference=D16, Package Version="4040047-6/M, 06/2011", Peak DC Collector Current=0.5A, Category=DarlingtonBJT, Configuration=Array7, Datasheet URL=http://www.ti.com/general/docs/lit/getliterature.tsp?genericPartNumber=uln2003a&fileType=pdf, Datasheet Version="Rev. O, 01/2016", Manufacturer URL=http://www.ti.com/, Mounting=SurfaceMount, Package URL=http://www.ti.com/lit/ml/mpds178g/mpds178g.pdf, Packaging=Tape&Reel, Rad Hard=No, Type=NPN
U103: "4-ch, 2-input, 2-V to 6-V 5.2 mA drive strength XOR (exclusive OR) gate", Package="TSSOP-14 Texas Instruments", Check_prices=https://www.snapeda.com/parts/SN74HC86PWR/Texas+Instruments/view-part/?ref=eda, MF="Texas Instruments", MP=SN74HC86PWR, SnapEDA_Link=https://www.snapeda.com/parts/SN74HC86PWR/Texas+Instruments/view-part/?ref=snap
U104: "4-ch, 2-input, 2-V to 6-V 5.2 mA drive strength AND gate", Package="TSSOP-14 Texas Instruments", Check_prices=https://www.snapeda.com/parts/SN74HC08PWR/Texas+Instruments/view-part/?ref=eda, MF="Texas Instruments", MP=SN74HC08PWR, SnapEDA_Link=https://www.snapeda.com/parts/SN74HC08PWR/Texas+Instruments/view-part/?ref=snap
U105 U106: library part CMP-1623-00106-2, "High Speed CMOS Logic 4-Bit Binary Full Adder with Fast Carry, D0016A, LARGE T&R", F @ Nom Voltage(Max)(Mhz)=28, Generic Part Number=CD74HC283, ICC @ Nom Voltage(Max)(mA)=0.08, Manufacturer="Texas Instruments", Operating Temperature Range(C)="-55 to 125", Rating=Catalog, tpd @ Nom Voltage(Max)(ns)=42, Voltage(Nom)(V)=3.3,5, Bits(#)=4, Code_JEDEC="MS-012 variation AC", DatasheetVersion=SCHS176D, Function=Arithmetic, Input Type=LVTTL/CMOS, Inputs=9, Output Drive (IOL/IOH)(Max)(mA)=5.2/-5.2, Output Type=CMOS, PackageReference=D0016A, Schmitt Trigger=No, Technology Family=HC, Type=Binary, VCC(Max)(V)=6, VCC(Min)(V)=2
U107: library part CMP-0388-00338-2, "CMOS BCD-to-7-Segment LED Latch / Decoder / Driver, 3 to 18 V, -55 to 125 degC, 16-pin SOP (NS16), Green (RoHS & no Sb/Br)", Manufacturer="Texas Instruments", Rating=Military, ComponentLink1Description="Manufacturer URL", ComponentLink1URL=http://www.ti.com/, ComponentLink2Description=Datasheet, ComponentLink2URL=http://www.ti.com/general/docs/lit/getliterature.tsp?genericPartNumber=CD4511B&fileType=pdf, ComponentLink3Description="Package Specification", ComponentLink3URL=http://www.ti.com/litv/pdf/msop002a, DatasheetVersion=SCHS072B, Eco-Plan="Green (RoHS & no Sb/Br)", Mounting Technology="Surface Mount", PackageDescription="16-Pin Plastic Small Outline, Body 10.20 x 5.30 mm, Pitch 1.27 mm", PackageReference=NS0016A, PackageVersion=4040062/C, PartNumber=CD4511BNSR, SubFamily="Discrete Segment LED Driver", Vin(Max)(V)=18, Vin(Min)(V)=3
U108 U109: library part CMP-1633-00848-2, "Quadruple 2-Line To 1-Line Data Selectors/Multiplexers, PW0016A, LARGE T&R", F @ Nom Voltage(Max)(Mhz)=28, Generic Part Number=SN74HC157, ICC @ Nom Voltage(Max)(mA)=10, Manufacturer="Texas Instruments", Operating Temperature Range(C)="-40 to 85", Rating=Catalog, tpd @ Nom Voltage(Max)(ns)=32, Voltage(Nom)(V)=3.3,5, Bits(#)=2, Channels(#)=4, Code_JEDEC=MO-153, Configuration=2：1, DatasheetVersion=SCLS113D, Function=Encoder/Multiplexer, Input Type=LVTTL/CMOS, Output Drive (IOL/IOH)(Max)(mA)=7.8/-7.8, Output Type=CMOS, PackageReference=PW0016A, Schmitt Trigger=No, Technology Family=HC, Type=Standard, VCC(Max)(V)=6, VCC(Min)(V)=2
U201: "15V Dual LinCMOS timer", Package="SOIC-14 Texas Instruments", Check_prices=https://www.snapeda.com/parts/TLC556IDR/Texas+Instruments/view-part/?ref=eda, MF="Texas Instruments", MP=TLC556IDR, SnapEDA_Link=https://www.snapeda.com/parts/TLC556IDR/Texas+Instruments/view-part/?ref=snap
U202: library part CMP-1575-00078-4, "High Speed CMOS 8-Channel Analog Multiplexer/Demultiplexer, PW0016A, LARGE T&R", Generic Part Number=CD74HC4051, Manufacturer="Texas Instruments", Operating Temperature Range(C)="-55 to 125", Rating=Catalog, Bandwidth(Max)(MHz)=180, Code_JEDEC=MO-153, Configuration="1 X 1：8 MUX", Crosstalk=Yes, DatasheetVersion=SCHS122J, Output Type=CMOS, PackageReference=PW0016A, PackageVersion=http://www.ti.com/lit/ml/mpds361/mpds361.pdf, Ron(Max)(Ohms)=130, Ron(Typ)(Ohms)=45, VCC(Max)(V)=6, VCC(Min)(V)=2

## Via types
v1: diameter 0.6, hole 0.3, Top Layer to Bottom Layer, 131 vias
v2: diameter 0.8, hole 0.5, Top Layer to Bottom Layer, 1 vias

## Nets (pads, with @x,y where several pads share a name; then routed paths per layer and width w, separated by ;. In a path a pad name is that pad's centre, name@x,y a point inside that pad or via, vN(x,y) a via of type N, cw(c..) or ccw(c..) an arc to the next point about the centre after c; other vN are vias at no path point)
+5V_IN: J101.1 Q101.3 | length 10.2
  Bottom Layer w0.6: 14.5,43.05 15.35,43.9 15.7,43.9 Q101.3
  Bottom Layer w1: J101.1 14.5,43.05
+5V_LOGIC: C104.1 C105.2 C108.1 C109.1 C110.1 C111.2 C112.2 C113.1 C114.1 C115.1 C201.1 C206.2 FB101.2 R104.1 R105.1 R106.1 R107.1 R108.1 R109.1 R201.2 R203.2 R204.2 R205.2 U101.20 U103.14 U104.14 U105.16 U106.16 U107.3 U107.4 U107.16 U108.3 U108.16 U109.3 U109.6 U109.10 U109.16 U201.4 U201.10 U201.14 U202.16 | length 108.5
  Top Layer w0.5: v1(105.8,47.9) 108.881,50.981 109.181,50.981 v1(109.2,51)
  Bottom Layer w0.3: R104.1 v1(22.8,28.6) ; v1@96.9,67.7 v1(96.87,67.73) U104.14 98.445,69.05 98.72,68.775 98.994,68.775 99.3,68.469 C109.1 ; U107.16@105.305,45.259 U107.16@105.405,45.359 ; v1(111.9,67.7) 111.864,67.736 U103.14 113.26,69.044 113.593,68.711 113.994,68.711 114.3,68.405 C110.1 ; v1(141,54.3) 141,54.281 141.7,53.581 141.7,50.725 U109.3 ; U109.6 U109.6@143.588,50.662 ; v1@143.588,52.288 v1(143.6,52.3) ; U109.10@144.25,44.725 144.3,44.675 144.3,44 144.8,43.5
  Bottom Layer w0.4: R205.2 60.444,89.908 61.394,90.857 61.394,90.967 C206.2@61.65,91.223 ; U202.16 61.173,91.7 C206.2@61.65,91.223 ; C206.2 C206.2@61.65,91.223 ; R204.2 63.195,93.055 63.195,94.645 R203.2
  Bottom Layer w0.5: v1(35.6,89.6) 37.63,91.63 38.425,91.63 U201.10 39.21,91.73 40.48,93 ; C201.1 36.741,96.9 37.29,96.9 ; v1(37.3,99.7) 37.3,98.2 37.29,98.19 37.29,96.9 ; U201.14@37.75,96.9 37.29,96.9 ; U201.14@37.84,96.81 U201.14 39.21,96.81 40.48,95.54 40.48,93 ; R201.2@45.95,92.3 45.95,92.4 45.35,93 U201.4 40.48,93 ; v1@94.2,83.2 v1(94.259,83.141) C108.1 ; C108.1@95.8,83.289 C108.1 ; U101.20 98.317,82.427 97.603,83.141 C108.1 ; C113.1@105.195,43.8 105.195,43.84 104.988,44.046 104.988,44.883 105.405,45.3 105.405,45.359 105.405,45.725 U107.16 105.455,47.528 105.8,47.873 v1(105.8,47.9) ; v1(122.1,44.9) 122.127,44.9 122.177,44.85 U108.16 ; C114.1 123.525,42.494 U108.16 ; U108.3 124.825,47.825 123.525,46.525 U108.16 ; v1(138.8,44.7) 138.827,44.7 138.877,44.75 U109.16 ; U109.6@143.588,50.662 v1@143.588,52.288 ; 144.8,43.5 v1(145.6,42.7)
  Bottom Layer w0.6: FB101.2 40,48.1 41.191,46.909 C105.2 ; v1(42.6,48.8) 42.6,46.95 C105.2 ; R105.1 v1(44.8,28.5) ; 44.106,47.225 43.791,46.909 C105.2 ; 44.175,47.225 C104.1 ; v1(60.7,28.3) R106.1 ; R107.1 v2(88.9,28.5) ; v1(96.8,54.6) 96.825,54.625 U105.16 98.646,56.555 98.809,56.719 C111.2 ; v1(99.3,66.4) C109.1 ; U107.3 U107.4 109.265,51.065 v1(109.2,51) ; R108.1 v1(110.9,28.1) ; v1(111.7,54.8) 111.7,56.53 111.725,56.555 U106.16 111.85,56.58 113.839,56.58 C112.2 ; R109.1 v1(132.9,28.3)
+5V_MAIN: C101.2 C102.2 C103.1 FB101.1 Q101.2 R102.1 R103.1 | length 202
  Top Layer w1: v1@19.817,89.249 23.666,85.4 v1(60.6,85.4) 68.5,93.3 v1(68.5,97.7)
  Bottom Layer w0.4: v1(19.771,89.241) R102.1 ; v1(68.5,97.7) 68.513,97.687 70.988,97.687 R103.1
  Bottom Layer w0.6: Q101.2 19.765,43.05 19.779,43.064 ; 29.05,47.85 C102.2 ; C102.2@31.15,47.85 33.241,47.85 C103.1@33.7,47.391 ; C103.1@33.7,47.276 33.956,47.02 34.68,47.02 36,45.7 FB101.1
  Bottom Layer w1: 19.779,43.064 19.793,43.05 21.3,43.05 C101.2@23.962,45.712 ; C101.2 26.1,47.85 29.05,47.85 ; C102.2 31.15,47.85 34.3,51 84.5,51 86.5,53 86.5,83.5 84.6,85.4 v1(60.6,85.4) ; C103.1 C103.1@33.7,47.391
+5V_SENSOR: C107.2 J104.1 R103.2 | length 8.5
  Bottom Layer w0.4: C107.2@70.9,93.05 71,93.15 R103.2 ; C107.2 71.525,92.525 75.125,92.525 J104.1
+5V_SERVO: C106.P C207.1 J201.1 R102.2 | length 27.2
  Bottom Layer w0.8: C207.1 4.9,95.394 4.956,95.45 J201.1 8.66,95.65 9.034,95.65 10.484,97.1 22.081,97.1 24.2,94.981 C106.P R102.2@19.752,93.2
COUNT0: U106.4 U107.7 U202.11 | length 125.3
  Top Layer w0.3: v1(62.2,96.8) 62.257,96.857 62.257,97.462 64.396,99.6 111.6,99.6 114.75,96.45 114.75,71.866 114.104,71.22 114.104,61.904 112.6,60.4 v1(107.4,60.4)
  Bottom Layer w0.3: U202.11 60.35,94.95 v1(62.2,96.8) ; v1(107.4,60.4) 107.365,60.365 U106.4 104.065,60.365 102.8,59.1 102.8,53.6 106,50.4 111.6,50.4 112.997,51.797 112.997,52.747 U107.7
COUNT1: U106.1 U107.1 U202.10 | length 117.7
  Top Layer w0.3: v1(61,97.3) 61.004,97.304 61.004,98.2 63.558,100.754 112.046,100.754 115.9,96.9 115.9,60.446 113.15,57.696 105.296,57.696 v1(104.1,56.5)
  Bottom Layer w0.3: U202.10 60.217,95.6 61,96.383 v1(61,97.3) ; v1(104.1,56.5) 104.155,56.555 U106.1 106.175,54.692 105.455,53.972 U107.1
COUNT2: U106.13 U107.2 U202.9 | length 109
  Top Layer w0.3: v1(62.2,98.4) 64,100.2 111.8,100.2 115.34,96.66 115.34,61.94 v1(113.7,60.3)
  Bottom Layer w0.3: U202.9 59.075,96.325 59.65,96.325 60.179,96.854 60.179,97.475 61.104,98.4 v1(62.2,98.4) ; U107.2 106.841,52.941 106.841,53.741 107.4,54.3 107.4,56.88 110.776,60.256 111.716,60.256 U106.13 113.608,60.365 113.673,60.3 v1(113.7,60.3)
DISP_CENTER_BUF: U101.16 U102.2 U103.2 U104.2 | length 59.3
  Top Layer w0.3: v1@88.9,69.5 88.9,75.883 92.117,79.1 96.275,79.1 97.053,79.877 v1(97.113,79.877) ; v1@88.943,69.457 v1(89,69.4) ; v1@89.05,69.45 89.643,70.043 v1(103.935,70.043)
  Bottom Layer w0.3: U102.2 90.725,51.425 89.996,50.696 89.153,50.696 88.726,51.123 88.726,60.084 89,60.358 v1(89,69.4) 89.081,69.4 89.381,69.7 U104.2 ; v1(97.113,79.877) 97.163,79.827 U101.16 ; v1(103.935,70.043) 103.975,70.043 104.322,69.696 U103.2@106.126,69.696
DISP_LEFT_BUF: U101.18 U102.1 U103.1 U104.1 | length 56.5
  Top Layer w0.3: v1(97.1,81.077) 97.087,81.064 93.297,81.064 88.4,76.167 88.4,69.151 89.701,67.85 89.769,67.85 89.919,67.7 v1(90,67.7) 91.3,69 v1(103.9,69)
  Bottom Layer w0.3: U102.1 89.455,67.155 90.871,68.571 90.871,68.995 90.926,69.05 U104.1 ; v1(97.1,81.077) 97.15,81.127 U101.18 ; v1(103.9,69) 103.922,69.022 106.102,69.022 U103.1
DISP_RIGHT_BUF: U101.14 U102.3 U103.4 U104.4 | length 59.7
  Top Layer w0.3: v1(97.127,78.527) 92.327,78.527 89.5,75.7 v1(89.5,70.8) 103.619,70.8 103.819,71 v1(103.9,71)
  Bottom Layer w0.3: U104.4 91.119,70.989 89.771,70.989 89.581,70.8 v1(89.5,70.8) 89.5,70.749 88,69.249 88,51.066 88.924,50.142 90.712,50.142 91.995,51.425 U102.3 ; v1(97.127,78.527) U101.14 ; v1(103.9,71) 103.903,70.997 106.127,70.997 U103.4@106.13,71
GND: C101.1 C102.1 C103.2 C104.2 C105.1 C106.N C107.1 C108.2 C109.2 C110.2 C111.1 C112.1 C113.2 C114.2 C115.2 C201.2 C202.1 C203.2 C204.1 C205.2 C206.1 C207.2 DS101.3 DS101.8 J101.2 J104.2 J106.8 J201.2 R101.2 R117.2 R118.2 R119.2 R120.2 R121.2 R122.2 R123.2 U101.1 U101.10 U101.17 U101.19 U102.7 U102.8 U103.7 U103.12 U103.13 U104.7 U104.12 U104.13 U105.7 U105.8 U105.11 U105.12 U105.14 U105.15 U106.7 U106.8 U106.11 U106.12 U106.15 U107.5 U107.6 U107.8 U108.6 U108.8 U108.10 U108.13 U108.15 U109.8 U109.13 U109.14 U109.15 U201.7 U202.6 U202.7 U202.8 | length 185.7
  Top Layer w0.254: J201.2 J201.2@10.463,95.453
  Bottom Layer w0.254: J201.2 J201.2@10.463,95.453
  Bottom Layer w0.3: v1(31.1,44.2) C102.1 ; v1(33.7,44.2) C103.2 ; v1(42.5,44.2) 42.5,45.569 C105.1 ; v1(45.1,44.2) C104.2 ; U104.7 91.145,72.95 91.2,73.005 v1(91.2,74.1) ; U105.7 U105.8 v1(91.175,66.875) v1@91.2,66.9 ; C108.2 95.824,81.835 95.824,81.02 96.367,80.477 U101.17 ; C108.2@95.841,81.818 U101.19@98.967,81.818 ; R122.2 96.077,86.323 96.256,86.144 96.256,85.544 v1(96.7,85.1) ; U105.15 U105.14 97.325,59.095 97.5,58.92 97.5,58.871 97.951,58.42 98.88,58.42 v1(98.9,58.4) ; U105.12 U105.11 98.005,62.905 v1(98.8,63.7) ; U104.12 U104.13 99.241,69.7 C109.2 99.3,71.8 v1(100.3,72.8) ; U102.7 U102.8 99.994,51.925 100.119,51.8 v1(100.2,51.8) C111.1 ; C111.1@100.17,56.749 C111.1 ; C111.1@100.476,57 100.481,57 C111.1 ; v1(102,85.1) R120.2 ; v1(102.102,44.24) 102.183,44.24 102.583,43.84 C113.2 ; v1(103.9,65.4) 103.927,65.4 103.972,65.445 U106.8 U106.7 U106.7@106.15,64.2 ; U101.10 104.567,75.433 v1(104.583,75.417) 104.629,75.371 104.629,75.001 106.13,73.5 U103.7@106.13,72.95 ; U101.1 105.217,82.427 106.089,83.3 v1(106.1,83.3) ; v1(105,85.1) R119.2 ; U107.5 U107.5@110.568,52.857 ; v1(110.6,54.6) 110.568,54.568 U107.5@110.568,52.857 ; v1(111,85) R117.2 ; U107.6 110.6,52.825 U107.5@110.568,52.857 ; U106.15 112.325,57.825 112.5,58 112.5,58.124 112.676,58.3 v1(115.2,58.3) 115.2,56.741 C112.1 ; U106.12 U106.11 113.495,62.905 v1(113.5,62.9) ; U103.12 U103.13 114.247,69.694 C110.2 114.359,69.7 v1(116.5,69.7) ; v1(114.3,54.6) 114.322,54.578 114.322,52.848 U107.8 ; U108.15 124.196,44.829 124.196,43.904 124.834,43.266 125.475,43.266 ; C114.2 126.319,42.4 126.43,42.511 v1(126.511,42.511) 126.5,42.522 126.5,43.255 126.511,43.266 ; U108.13 125.475,43.266 ; v1(126.7,52.4) 126.738,52.362 126.738,50.788 126.779,50.746 126.779,49.821 127.1,49.5 127.8,49.5 128.075,49.775 U108.8 ; U108.10 127.35,44.775 127.35,44.174 127.3,44.124 127.3,44.055 126.511,43.266 ; U109.15@140.975,44.275 U109.15 U109.14 U109.13 142.35,44.675 142.35,43.85 v1(143.5,42.7) C115.2 ; U109.8 v1(145.85,50.65) v1@145.9,50.6 ; 125.475,43.266 126.511,43.266
  Bottom Layer w0.4: J101.2 J101.2@8.474,39.024 ; C203.2 47.413,93.992 48.592,93.992 v1(48.6,94) ; v1(51.1,95.6) U202.7 ; 52.9,95.2 U202.7 ; U202.8 U202.7 ; C206.1 63.058,91.24 64.798,91.24 v1(64.815,91.258) ; v1(68.6,91.1) C107.1@70.95,91.1 ; C107.1 C107.1@70.95,91.1 ; J104.2 78,90.5 76.8,89.3 74,89.3 72.2,91.1 C107.1@70.95,91.1 ; v1(93,84.8) R123.2 ; v1@94.3,81.9 v1(94.341,81.859) C108.2 ; C108.2@95.824,81.835 C108.2@95.841,81.818 ; R121.2 R120.2 ; R119.2 R118.2 ; J106.8 v1(112.05,92.55)
  Bottom Layer w0.6: C207.2@5.056,93.863 C207.2 v1(4.9,91.9) 6.91,91.9 J201.2 ; J101.2@8.474,39.024 16.35,46.9 R101.2 ; R101.2@16.2,49 17.9,50.7 21.55,50.7 C101.1 ; C106.N 32.349,93.2 32.7,93.551 32.7,97.4 33.283,97.983 34.342,97.983 C201.2 ; C204.1 34.109,94.2 32.7,92.791 32.7,91.551 33.051,91.2 34.1,91.2 C205.2 ; U201.7@43.2,89.19 U201.7@43.3,89.19 ; v1(43.3,87.7) U201.7@43.3,89.19 ; C202.1 46.36,89.19 U201.7 U201.7@43.3,89.19 ; v1@48.584,93.984 v1@48.592,93.992 ; v1(130.6,58.2) 130.6,61.9 DS101.3 ; DS101.8 v1(130.7,96)
NetC202_2: C202.2 R202.1 U201.2 U201.6 | length 16.1
  Top Layer w0.4: v1(48.5,90.5) 48.538,90.538 48.705,90.538 49.354,91.188 49.354,94.846 v1(48.6,95.6)
  Bottom Layer w0.4: U201.6 43.495,90.48 46.38,90.48 C202.2 v1(48.5,90.5) ; U201.2 43.48,95.545 46.295,95.545 46.325,95.575 48.575,95.575 v1(48.6,95.6)
NetC203_1: C203.1 U201.3 | length 2.6
  Bottom Layer w0.4: U201.3 45.72,94.27 C203.1
NetC204_2: C204.2 U201.12 U201.13 U202.3 | length 27.5
  Top Layer w0.3: v1(36.8,95.54) 36.8,97.055 37.645,97.9 47.296,97.9 50.9,94.296 v1(50.9,92.8)
  Bottom Layer w0.3: 51.154,93 U202.3
  Bottom Layer w0.4: C204.2 35.535,94.235 38.49,94.235 U201.12 ; v1(36.8,95.54) U201.13 U201.12 ; U201.12@37.814,94.27 U201.12 ; v1(50.9,92.8) v1@50.954,92.8
NetC205_1: C205.1 U201.11 | length 3.5
  Bottom Layer w0.4: C205.1 37.3,93 U201.11
NetD101_1: D101.1 R104.2 | length 6.4
  Bottom Layer w0.4: D101.1 20.1,34.9 R104.2
NetD101_2: D101.2 U102.16 | length 73.9
  Bottom Layer w0.4: D101.2 23.925,35 32.236,43.31 88.21,43.31 89.455,44.555 U102.16
NetD102_1: D102.1 R105.2 | length 6.5
  Bottom Layer w0.4: R105.2 D102.1
NetD102_2: D102.2 U102.15 | length 53.6
  Bottom Layer w0.4: D102.2 50.591,42.341 89.322,42.341 90.725,43.745 U102.15
NetD103_1: D103.1 R106.2 | length 6.7
  Bottom Layer w0.3: R106.2 64,28.4 D103.1
NetD103_2: D103.2 U102.14 | length 34.5
  Bottom Layer w0.4: D103.2 65.25,37.05 69.5,41.3 90.3,41.3 91.995,42.995 U102.14
NetD104_1: D104.1 R107.2 | length 6.9
  Bottom Layer w0.3: D104.1 R107.2 86,28.6 R107.2@86.2,28.8
NetD104_2: D104.2 U102.13 | length 13.8
  Bottom Layer w0.3: D104.2 93.265,41.015 U102.13
NetD105_1: D105.1 R108.2 | length 6.9
  Bottom Layer w0.3: D105.1 108.1,34.9 R108.2
NetD105_2: D105.2 U102.12 | length 20.6
  Bottom Layer w0.4: U102.12 94.535,44.665 100.2,39 105.785,39 109.108,35.677 109.108,35.142 D105.2
NetD106_1: D106.1 R109.2 | length 6.5
  Bottom Layer w0.3: D106.1 129.85,28.45 R109.2
NetD106_2: D106.2 U102.11 | length 41.6
  Bottom Layer w0.4: U102.11 95.805,44.32 100.229,39.896 126.889,39.896 131.108,35.677 131.108,35.142 D106.2@131.25,35
NetDS101_1: DS101.1 R114.1 | length 4.5
  Bottom Layer w0.3: R114.1 125.62,58.02 DS101.1 125.841,61.706 DS101.1@125.841,61.584
NetDS101_2: DS101.2 R113.1 | length 4
  Bottom Layer w0.3: DS101.2 128.16,58.04 R113.1
NetDS101_4: DS101.4 R112.1 | length 4
  Bottom Layer w0.3: R112.1 133.24,58.04 DS101.4
NetDS101_6: DS101.6 R111.1 | length 38.2
  Bottom Layer w0.3: DS101.6 135.78,90.52 143.2,83.1 143.2,58.8 143.8,58.2 143.8,58.1 144.125,57.775 R111.1@144.225,57.775
NetDS101_7: DS101.7 R110.1 | length 38.4
  Bottom Layer w0.3: DS101.7 133.24,92.277 142.6,82.917 R110.1
NetDS101_9: DS101.9 R115.1 | length 39.2
  Bottom Layer w0.3: DS101.9 128.16,90.74 137.9,81 137.9,59.4 R115.1
NetDS101_10: DS101.10 R116.1 | length 39.4
  Bottom Layer w0.3: DS101.10 137.3,80.72 137.3,58 R116.1
NetJ105_3: J105.3 SW101.1 | length 107.7
  Top Layer w0.6: v1(89,89.2) 87.8,88 87.8,48.011 96.4,39.411 96.4,11.851 103.911,4.34 v1(112.54,4.34)
  Bottom Layer w0.6: v1(89,89.2) J105.3 ; v1(112.54,4.34) SW101.1
NetJ201_3: J201.3 R206.2 | length 3.4
  Bottom Layer w0.8: J201.3 15.65,95.45 15.7,95.4 R206.2@15.815,95.4
NetQ101_1: Q101.1 R101.1 | length 3.6
  Bottom Layer w0.4: Q101.1@18.2,44.932 R101.1@18.2,48.566
NetR201_1: R201.1 R202.2 U201.1 | length 11.2
  Bottom Layer w0.4: U201.1 43.495,96.83 46.28,96.83 R202.2 48.416,96.85 49.354,95.912 49.354,93.654 48.2,92.5 47.4,92.5 47.3,92.4 R201.1
NetR203_1: R203.1 U202.13 | length 3
  Bottom Layer w0.3: U202.13 59.021,93.671 59.938,93.671 60.826,94.558 61.408,94.558 R203.1
NetR204_1: R204.1 U202.14 | length 2.5
  Bottom Layer w0.3: U202.14 R204.1
NetR205_1: R205.1 U202.1 U202.2 U202.4 U202.5 U202.12 U202.15 | length 19.4
  Bottom Layer w0.3: R205.1 52.884,91.684 U202.1 52.921,91.721 54.121,91.721 55,92.6 55,93.65 ; U202.2@52.9,92.3 U202.2 52.921,92.371 53.838,92.371 55,93.533 55,93.65 ; U202.4 55,93.65 ; U202.5 52.975,94.225 54.425,94.225 55,93.65 ; U202.15 58.979,92.371 58.062,92.371 57.5,92.933 57.5,93.65 ; U202.12 58.979,94.279 57.879,94.279 57.5,93.9 57.5,93.65 ; 55,93.65 57.5,93.65
  Bottom Layer w0.4: U202.2@52.9,92.3 U202.2@52.91,92.3
NetU107_9: U107.9 U109.2 | length 36.6
  Top Layer w0.3: v1(114.377,43.982) 114.959,43.4 136.5,43.4 141,47.9 v1(141,52.3)
  Bottom Layer w0.3: U107.9 114.361,45.759 114.361,43.998 v1(114.377,43.982) ; U109.2 140.988,50.662 140.988,52.288 v1(141,52.3)
NetU107_10: U107.10 U108.14 | length 18.6
  Top Layer w0.3: v1(113.075,44.004) 113.075,46.675 113.9,47.5 123.799,47.5 124.799,46.5 v1(124.825,46.5)
  Bottom Layer w0.3: v1(113.075,44.004) U107.10 ; U108.14 v1(124.825,46.5)
NetU107_11: U107.11 U108.11 | length 22.4